# Altium PCB NB3000XN.PcbDoc (part 54 of 71)
Units mil, origin at the board's own origin, x right, y up, seen from the top; angles counter-clockwise.
Board outline 9527.56 x 6929.77 mil, 6 copper layers (Top Layer, GND+SHIELD, MidLayer1, MidLayer2, P2 - 3V3+5V0, Bottom Layer), stack 62.375 mil thick; 832 components, 1027 nets, 4655 pads, 4981 vias.
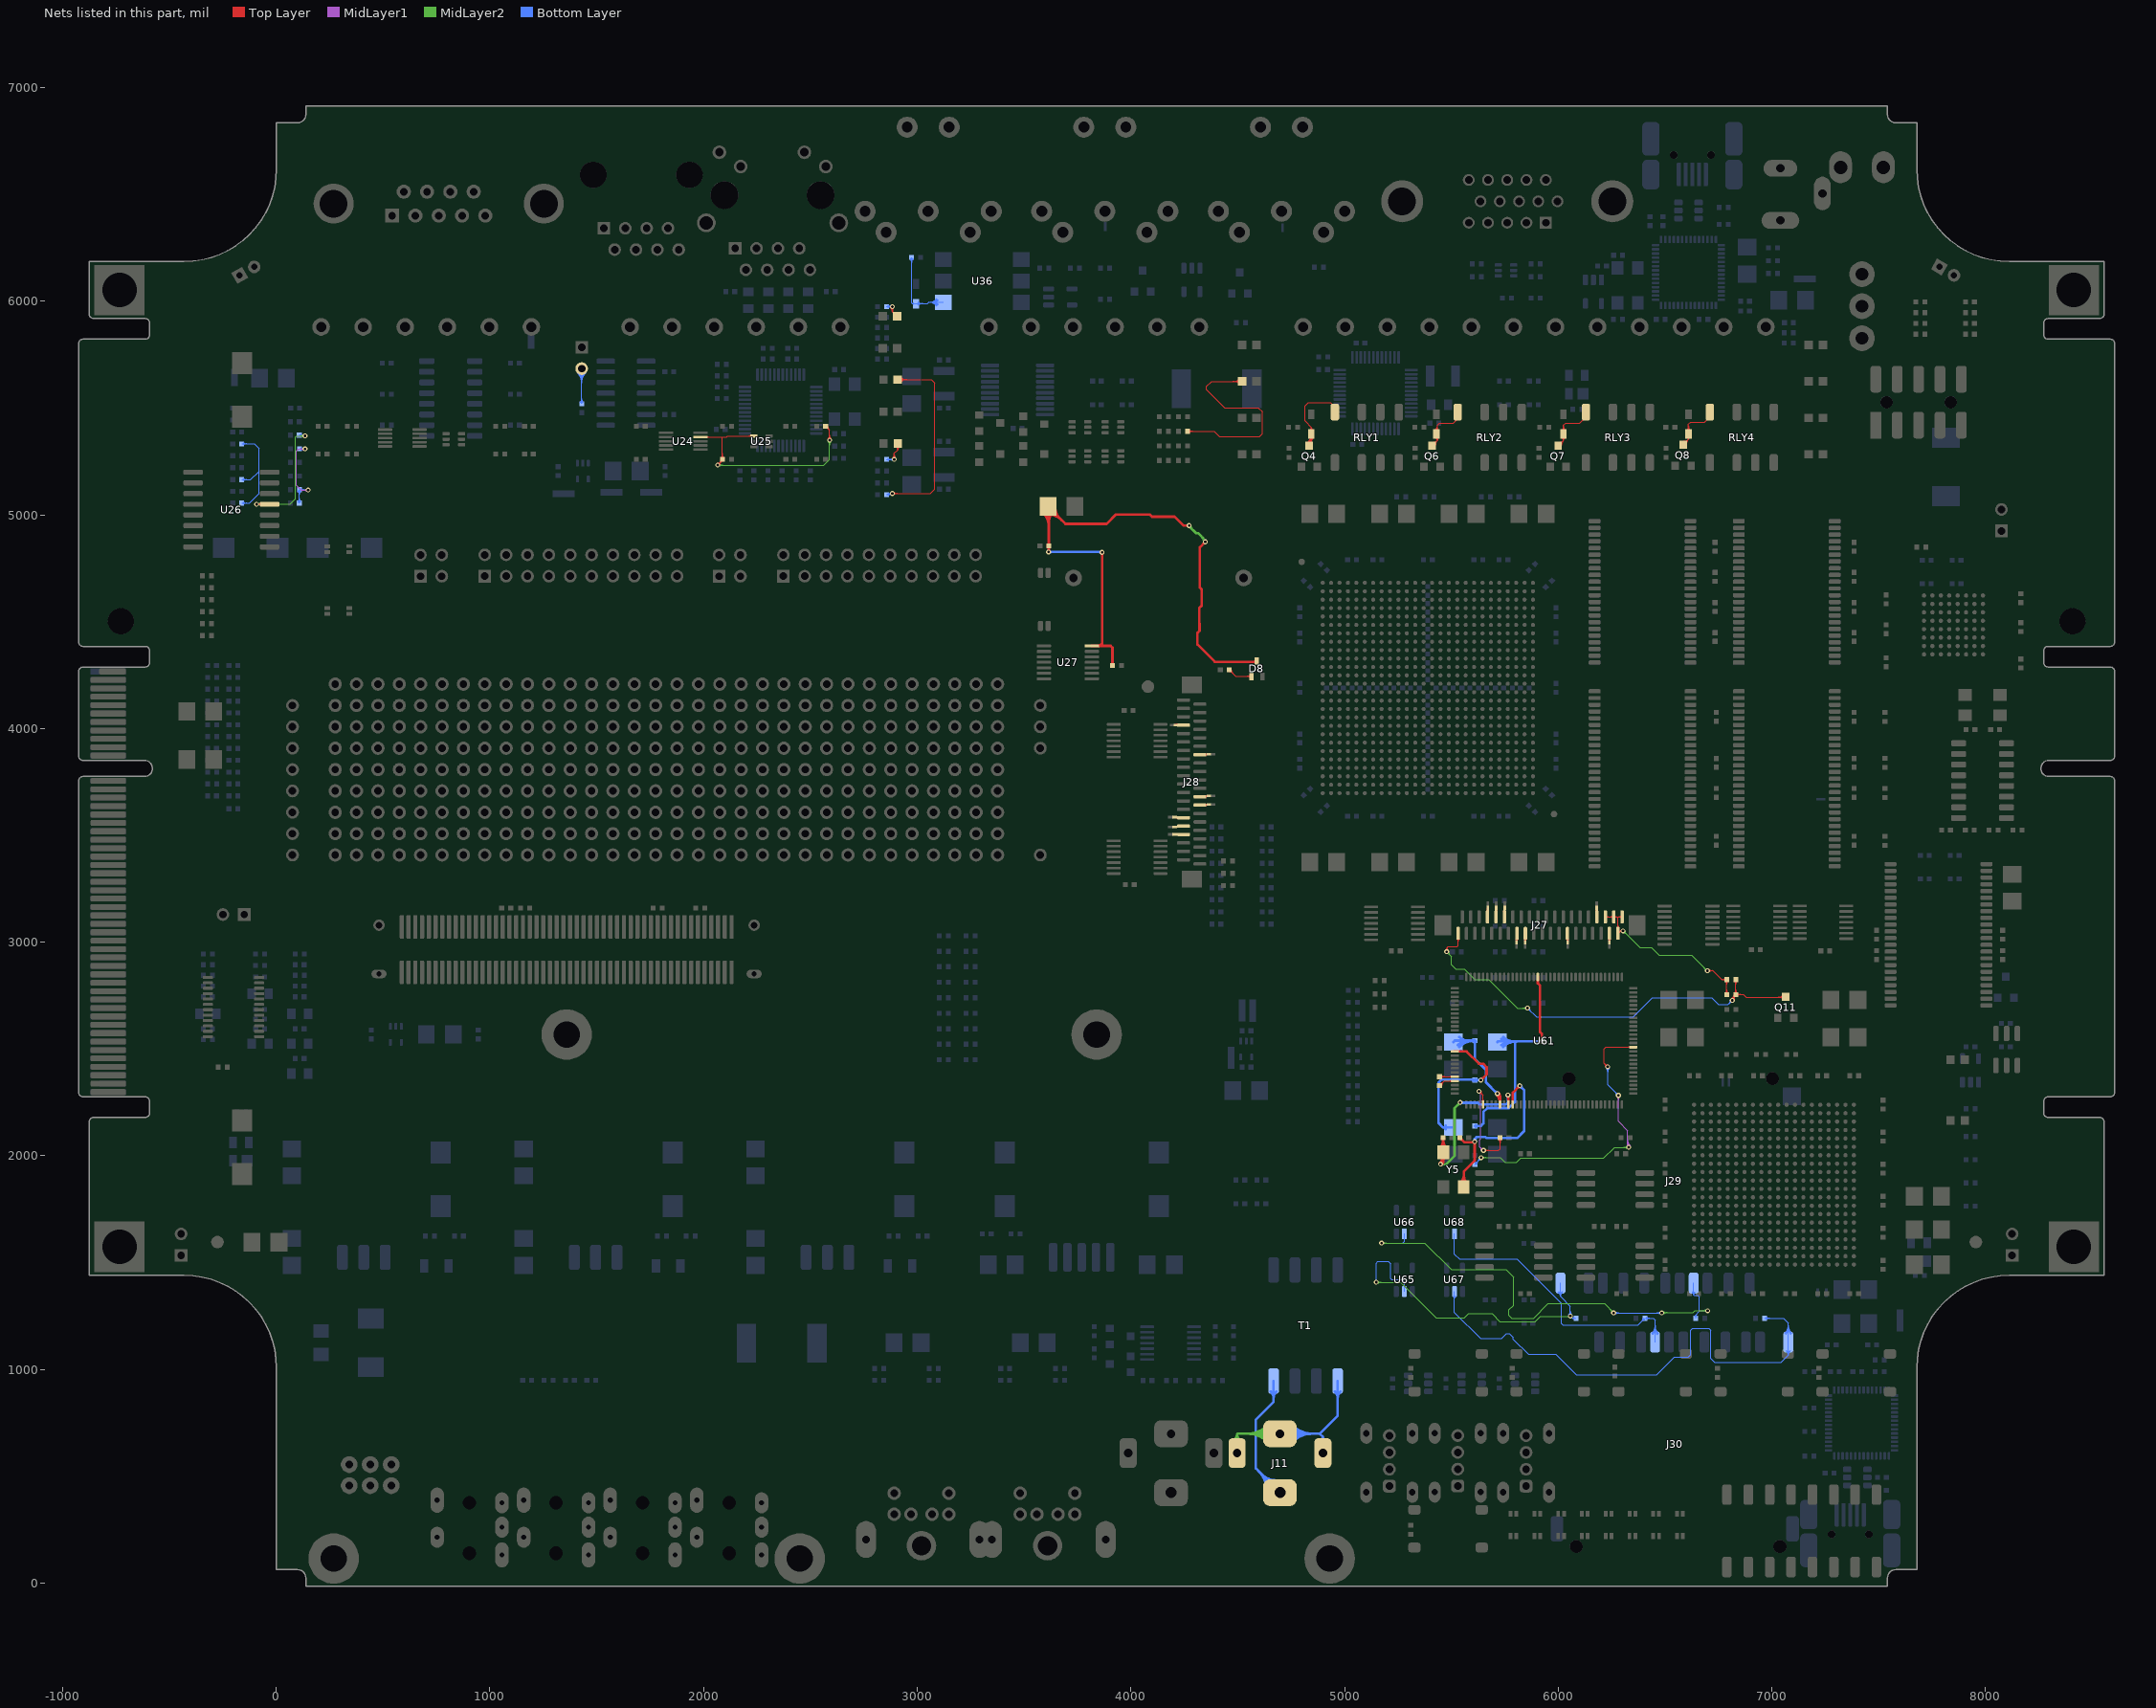
[diagram p58: the nets of this part, all layers, seen from the top]

## Via types
v1: diameter 23, hole 11.81, Top Layer to Bottom Layer, 3672 vias
v2: diameter 26, hole 11.81, Top Layer to Bottom Layer, 461 vias
v3: diameter 19, hole 11.81, Top Layer to Bottom Layer, tented both sides, 396 vias
v4: diameter 23.62, hole 11.81, Top Layer to Bottom Layer, 288 vias
v5: diameter 20, hole 11.81, Top Layer to Bottom Layer, 91 vias
v6: diameter 23, hole 11.81, Top Layer to Bottom Layer, tented both sides, 50 vias
v7: diameter 31, hole 11.81, Top Layer to Bottom Layer, 15 vias
v8: diameter 27.56, hole 11.81, Top Layer to Bottom Layer, tented both sides, 4 vias
v9: diameter 29, hole 11.81, Top Layer to Bottom Layer, 3 vias
v10: diameter 21, hole 11.81, Top Layer to Bottom Layer, 1 vias

## Nets (pads, with @x,y where several pads share a name; then routed paths per layer and width w, separated by ;. In a path a pad name is that pad's centre, name@x,y a point inside that pad or via, vN(x,y) a via of type N, cw(c..) or ccw(c..) an arc to the next point about the centre after c; other vN are vias at no path point) (continued)
NetC104_1: C104.1 R136.2 U24.4 U25.1 | length 1519
  Top Layer w4: U24.4@1985.71,5364.68 2089.69,5364.68 ; U24.4@2016,5361.86 cw(c2022.83,5355.03) 2022.83,5364.68 cw(c2022.83,5374.34) U24.4@2016,5367.51 ; v1(2066.19,5233.37) 2089.68,5256.87 R136.2@2089.68,5260 2087.19,5262.5 2087.19,5362.19 2089.69,5364.68 ; v1@2066.19,5238.87 ccw(c2066.19,5252.15) 2075.58,5242.76 ccw(c2084.97,5233.37) v1@2071.69,5233.37 ; v1@2066.19,5242.87 ccw(c2066.19,5265.81) 2082.41,5249.59 ccw(c2098.63,5233.37) v1@2075.69,5233.37 ; v1@2071.91,5239.1 ccw(c2051.5,5259.51) R136.2@2080.37,5259.51 ; 2078.28,5245.47 cw(c2089.68,5234.06) R136.2@2089.68,5250.19 ; 2078.74,5245.92 ccw(c2065.16,5259.51) R136.2@2084.37,5259.51 ; R136.2@2083.1,5267.08 ccw(c2073.21,5276.96) 2087.19,5276.96 ; 2087.19,5279.36 ccw(c2108.55,5279.36) R136.2@2093.45,5264.25 ; 2087.19,5289.02 ccw(c2118.21,5289.02) R136.2@2096.27,5267.08 ; U25.1@2221.99,5365.85 ccw(c2211.96,5355.82) 2211.96,5370 ccw(c2211.96,5384.18) U25.1@2221.99,5374.15 ; U25.1@2235,5370 2112.17,5370 2106.86,5364.68 2089.69,5364.68 ; C104.1@2571.54,5405.19 cw(c2571.53,5381.5) 2588.28,5398.25 cw(c2605.03,5415) C104.1@2581.35,5415 ; C104.1@2571.54,5409.19 cw(c2571.53,5395.16) 2581.45,5405.08 cw(c2591.38,5415) C104.1@2577.35,5415 ; C104.1@2571.54,5415 2590.19,5396.34 v1(2590.19,5350.04) ; v1@2583.47,5356.76 ccw(c2567.26,5372.98) 2590.19,5372.98 ccw(c2613.13,5372.98) v1@2596.91,5356.76 ; v1@2586.3,5353.93 ccw(c2576.91,5363.32) 2590.19,5363.32 ccw(c2603.47,5363.32) v1@2594.08,5353.93
  MidLayer2 w4: v1(2066.19,5233.37) 2535,5233.37 2563.37,5233.37 2590.19,5260.19 v1(2590.19,5350.04) ; v1@2070.08,5229.49 cw(c2079.47,5220.1) 2079.47,5233.37 cw(c2079.47,5246.65) v1@2070.08,5237.26 ; v1@2072.91,5226.66 cw(c2089.13,5210.44) 2089.13,5233.37 cw(c2089.13,5256.31) v1@2072.91,5240.09 ; v1@2583.47,5343.32 cw(c2567.26,5327.11) 2590.19,5327.11 cw(c2613.13,5327.11) v1@2596.91,5343.32 ; v1@2586.3,5346.15 cw(c2576.91,5336.76) 2590.19,5336.76 cw(c2603.47,5336.76) v1@2594.08,5346.15
NetC108_1: C108.1 U26.13 | length 913.3
  Top Layer w4: v1(-91.81,5050.04) -76.48,5050.04 ; v1@-88.12,5050.04 cw(c-88.12,5026.22) U26.13@-71.27,5043.06 ; v1@-87.92,5050.04 ccw(c-87.92,5073.59) U26.13@-71.27,5056.94 ; -78.46,5050.04 cw(c-78.46,5035.87) U26.13@-68.44,5045.89 ; -78.26,5050.04 ccw(c-78.26,5063.93) U26.13@-68.44,5054.11 ; U26.13@-73.93,5052.03 cw(c-76.43,5052.56) -76.43,5050 ; U26.13@-73.91,5052.1 cw(c-76.48,5052.66) -76.48,5050.04 ; U26.13@-30.87,5050 -76.43,5050 ; -76.48,5050.04 cw(c-76.48,5047.44) -73.93,5047.98 ccw(c-76.43,5047.44) -76.43,5050 ; -76.48,5050.04 -76.43,5050
  MidLayer2 w4: v1(-91.81,5050.04) 65.19,5050.04 90.19,5075.04 90.19,5365 95.19,5370 v1(135,5370) v1@135,5370.15 ; v1@-87.92,5046.15 cw(c-78.53,5036.76) -78.53,5050.04 cw(c-78.53,5063.32) v1@-87.92,5053.93 ; v1@-85.09,5043.32 cw(c-68.87,5027.11) -68.87,5050.04 cw(c-68.87,5072.98) v1@-85.09,5056.76 ; v1@128.28,5363.28 ccw(c112.06,5347.06) 112.06,5370 ccw(c112.06,5392.93) v1@128.28,5376.72 ; v1@131.11,5366.11 ccw(c121.72,5356.72) 121.72,5370 ccw(c121.72,5383.28) v1@131.11,5373.89
  Bottom Layer w4: C108.1@112.24,5368.83 cw(c122.16,5358.91) 122.16,5372.94 cw(c122.16,5386.97) C108.1@112.24,5377.05 ; C108.1@115.07,5366 cw(c131.81,5349.25) 131.81,5372.94 cw(c131.81,5396.62) C108.1@115.07,5379.88 ; C108.1@116.77,5372.94 cw(c116.77,5354.53) v1@130.81,5366.44 ; C108.1@119.16,5372.94 ccw(c119.16,5385.84) v1@128.28,5376.72 ; v1@127.76,5363.85 ccw(c108.13,5347.2) C108.1@108.13,5372.94 132.06,5372.94 v1(135,5370) v1@135,5370.15
NetC109_2: C109.2 R143.2 R146.1 | length 799.1
  MidLayer1 w4: v1@128.28,5302.65 ccw(c112.06,5286.43) 112.06,5309.37 ccw(c112.06,5332.3) v1@128.28,5316.09 ; v1@131.11,5305.48 ccw(c121.72,5296.09) 121.72,5309.37 ccw(c121.72,5322.65) v1@131.11,5313.26 ; v1(135,5309.37) 104.37,5309.37 95,5300 95,5138.65 116.94,5116.71 v1(149.52,5116.71) v1@151.52,5116.71 ; v1@142.81,5109.99 ccw(c126.59,5093.77) 126.59,5116.71 ccw(c126.59,5139.64) v1@142.81,5123.43 ; v1@145.64,5112.82 ccw(c136.25,5103.43) 136.25,5116.71 ccw(c136.25,5129.99) v1@145.64,5120.6
  Bottom Layer w4: C109.2@101.19,5062.02 ccw(c84.44,5078.77) 108.13,5078.77 ccw(c131.81,5078.77) C109.2@115.07,5062.02 ; R143.2@102.05,5111.57 cw(c86.14,5095.66) 108.64,5095.66 cw(c131.14,5095.66) R143.2@115.23,5111.57 ; C109.2@104.02,5059.19 ccw(c94.1,5069.11) 108.13,5069.11 ccw(c122.16,5069.11) C109.2@112.24,5059.19 ; R143.2@104.88,5114.4 cw(c95.8,5105.32) 108.64,5105.32 cw(c121.48,5105.32) R143.2@112.4,5114.4 ; C109.2@108.13,5055.08 108.13,5083.37 108.64,5083.89 R143.2@108.64,5118.65 135.52,5118.65 137.47,5116.71 v1(149.52,5116.71) ; R146.1@108.64,5309.37 v1(135,5309.37) ; R143.2@112.4,5114.89 cw(c121.48,5105.81) 121.48,5118.65 cw(c121.48,5131.5) R143.2@112.4,5122.41 ; R146.1@112.4,5305.61 cw(c121.48,5296.53) 121.48,5309.37 cw(c121.48,5322.21) R146.1@112.4,5313.13 ; R143.2@115.23,5112.06 cw(c131.14,5096.16) 131.14,5118.65 cw(c131.14,5141.15) R143.2@115.23,5125.24 ; R146.1@115.23,5302.78 cw(c131.14,5286.87) 131.14,5309.37 cw(c131.14,5331.86) R146.1@115.23,5315.96 ; v1@128.28,5302.65 ccw(c112.06,5286.43) 112.06,5309.37 ccw(c112.06,5332.3) v1@128.28,5316.09 ; v1@131.11,5305.48 ccw(c121.72,5296.09) 121.72,5309.37 ccw(c121.72,5322.65) v1@131.11,5313.26
NetC110_1: C110.1 R144.2 R145.2 | length 666
  Bottom Layer w4: C110.1@-161.36,5055.08 -124.92,5055.08 -80.81,5099.19 -80.81,5204.19 ; R145.2@-160.85,5165.08 -119.92,5165.08 -80.81,5204.19 ; R144.2@-160.85,5332.58 -102.58,5332.58 -80.81,5310.81 -80.81,5204.19 ; C110.1@-157.25,5050.97 cw(c-147.33,5041.05) -147.33,5055.08 cw(c-147.33,5069.11) C110.1@-157.25,5059.19 ; R145.2@-157.09,5161.32 cw(c-148.01,5152.24) -148.01,5165.08 cw(c-148.01,5177.92) R145.2@-157.09,5168.84 ; R144.2@-157.09,5328.82 cw(c-148.01,5319.74) -148.01,5332.58 cw(c-148.01,5345.42) R144.2@-157.09,5336.34 ; C110.1@-154.42,5048.14 cw(c-137.67,5031.4) -137.67,5055.08 cw(c-137.67,5078.77) C110.1@-154.42,5062.02 ; R145.2@-154.26,5158.49 cw(c-138.35,5142.58) -138.35,5165.08 cw(c-138.35,5187.58) R145.2@-154.26,5171.67 ; R144.2@-154.26,5325.99 cw(c-138.35,5310.08) -138.35,5332.58 cw(c-138.35,5355.08) R144.2@-154.26,5339.17
NetC115_1: C115.1 C116.1 D8.3 R148.1 U27.14 | length 3427.9
  Top Layer w4: C116.1@3615.19,4854.52 C116.1@3615.67,4855
  Top Layer w12: C115.1@3588.41,5012.47 cw(c3522.61,4946.66) 3615.67,4946.66 ; C115.1@3596.9,5020.95 cw(c3551.58,4975.63) 3615.67,4975.63 ; v1@3611.3,4830.6 ccw(c3600.76,4841.14) 3615.67,4841.14 ; C116.1@3611.56,4850.89 cw(c3601.64,4840.97) 3615.67,4840.97 cw(c3629.7,4840.97) C116.1@3619.78,4850.89 ; C116.1@3611.56,4859.11 ccw(c3601.64,4869.03) 3615.67,4869.03 ccw(c3629.7,4869.03) C116.1@3619.78,4859.11 ; C116.1@3612.01,4858.66 C116.1@3615.67,4855 ; C115.1@3612.01,5002.69 cw(c3612.01,4912.63) 3675.7,4976.31 ; C115.1@3612.01,5014.69 cw(c3612.01,4953.6) 3655.21,4996.8 ; C115.1@3612.01,5040 C115.1@3615.67,5036.34 ; v1@3615.67,4827.19 C116.1@3615.67,4855 ; 3615.67,4838.83 ccw(c3627.31,4838.83) v1@3619.08,4830.6 ; 3615.67,4964.34 cw(c3683.73,4964.34) C115.1@3635.6,5012.47 ; 3615.67,4993.31 cw(c3654.76,4993.31) C115.1@3627.12,5020.95 ; C115.1@3633.38,5036.06 ccw(c3675.47,5036.06) C115.1@3645.71,5006.3 ; C115.1@3645.38,5036.06 ccw(c3716.44,5036.06) 3666.19,4985.82 ; U27.14@3817.2,4386.77 3853.63,4386.77 ; U27.14@3843.78,4387.66 ccw(c3843.78,4413.59) 3862.11,4395.26 ; v1@3861.3,4821.15 cw(c3851.91,4811.76) 3865.19,4811.76 cw(c3878.47,4811.76) v1@3869.08,4821.15 ; v1(3865.19,4825.04) 3865.19,4398.33 3853.63,4386.77 ; R148.1@3910.06,4299.25 ccw(c3900.98,4308.33) 3913.82,4308.33 ccw(c3926.66,4308.33) R148.1@3917.58,4299.25 ; R148.1@3913.82,4295 3913.82,4378.77 3905.82,4386.77 3853.63,4386.77 ; v1@4268.97,4946.15 ccw(c4259.58,4936.76) 4259.58,4950.04 ccw(c4259.58,4963.32) v1@4268.97,4953.93 ; v1(4272.86,4950.04) 4246.67,4950.04 4205,4991.71 4099.14,4991.71 4089.03,5001.81 3930.28,5001.81 3886.96,4958.5 3693.51,4958.5 C115.1@3615.67,5036.34 ; v1@4343.02,4874.37 cw(c4329.75,4874.37) 4339.14,4864.99 cw(c4348.52,4855.6) v1@4348.52,4868.87 ; v1(4348.52,4874.37) 4323.02,4848.87 4323.02,4660.47 4331.5,4651.99 4331.5,4574.78 4320,4563.28 4320,4492.3 4321.5,4490.8 4321.5,4457.99 4312.02,4448.51 4312.02,4392.84 4392.65,4312.21 4586.78,4312.21 D8.3@4590,4315.43 ; 4572.57,4312.21 ccw(c4572.57,4332.87) D8.3@4587.17,4318.26 ; C116.1@3615.67,4855 C115.1@3615.67,5036.34
  MidLayer2 w12: v1(4272.86,4950.04) 4272.86,4946.8 4304.63,4915.02 4313.95,4915.02 4348.52,4880.45 v1(4348.52,4874.37) ; v1@4278.36,4950.04 ccw(c4299.46,4950.04) 4284.54,4935.12 ; 4334.84,4894.13 cw(c4315.09,4874.37) v1@4343.02,4874.37
  Bottom Layer w12: v1(3615.19,4826.71) v1@3863.52,4826.71 ; v1@3619.08,4822.82 cw(c3628.47,4813.43) 3628.47,4826.71 cw(c3628.47,4839.99) v1@3619.08,4830.6 ; 3847.89,4826.71 cw(c3847.89,4807.74) v1@3861.3,4821.15
NetC157_2: C157.2 U61.11 Y5.1 | length 1098.4
  Top Layer w12: v1@5445.64,1965.26 ccw(c5407.74,2003.16) Y5.1@5461.33,2003.16 ; Y5.1@5447.3,2035.7 ccw(c5413.42,2069.58) 5461.33,2069.58 ; v1(5449.52,1961.37) 5461.33,1973.18 ; Y5.1@5450.07,1994.96 cw(c5434.61,1973.17) 5461.33,1973.17 ; v1@5454.12,1956.78 ccw(c5436.71,1974.19) 5461.33,1974.19 ; C157.2@5457.22,2080.89 cw(c5447.3,2070.97) 5461.33,2070.97 cw(c5475.36,2070.97) C157.2@5465.44,2080.89 ; C157.2@5461.33,2075.23 ccw(c5517.23,2075.23) Y5.1@5477.7,2035.7 ; C157.2@5461.33,2085 5461.33,1973.18 ; Y5.1@5473.28,1993.9 ccw(c5485.29,1973.17) 5461.33,1973.17 ; v1@5761.11,2281.11 cw(c5747.26,2267.26) 5766.85,2267.26 ; v1(5765,2285) 5766.85,2283.15 U61.11@5766.85,2240
  MidLayer2 w12: v1(5449.52,1961.37) 5476.37,1961.37 5515.19,2000.19 5515.19,2223.71 v1(5541.52,2250.04) ; v1@5453.41,1957.49 cw(c5462.8,1948.1) 5462.8,1961.37 cw(c5462.8,1974.65) v1@5453.41,1965.26 ; v1@5536.02,2250.04 cw(c5522.75,2250.04) 5532.14,2240.65 cw(c5541.52,2231.26) v1@5541.52,2244.54
  Bottom Layer w12: v1(5541.52,2250.04) 5543.38,2248.19 5625,2248.19 5633.3,2239.89 5729.04,2239.89 5754.89,2239.89 5765,2250 v1(5765,2285) v1@5770.9,2285 ; v1@5545.41,2253.93 ccw(c5559.27,2267.79) 5559.27,2248.19 ; v1@5761.11,2281.11 cw(c5751.72,2271.72) 5765,2271.72 cw(c5778.28,2271.72) v1@5768.89,2281.11
NetC169_2: C169.2 U61.12 Y5.3 | length 1095.6
  Top Layer w12: C169.2@5539.33,2079.19 cw(c5539.33,2065.16) 5549.25,2075.08 cw(c5559.17,2085) C169.2@5545.14,2085 ; C169.2@5539.33,2085 5561.14,2063.19 5606,2063.19 v1(5609.19,2066.37) 5609.19,1977.37 5559.1,1927.29 5559.1,1855.1 Y5.3@5557.5,1853.5 ; Y5.3@5542.3,1872.7 ccw(c5501.73,1913.27) 5559.1,1913.27 ; 5559.1,1905.54 ccw(c5605.54,1905.54) Y5.3@5572.7,1872.7 ; v1@5605.3,2062.49 cw(c5595.91,2053.1) 5609.19,2053.1 cw(c5622.47,2053.1) v1@5613.08,2062.49 ; U61.12@5786.53,2240 5786.53,2273.8 5787.73,2275 5787.73,2295.92 v1(5820.19,2328.37) ; v1@5814.69,2328.37 cw(c5801.41,2328.37) 5810.8,2318.99 cw(c5820.19,2309.6) v1@5820.19,2322.87
  Bottom Layer w12: v1(5609.19,2066.37) 5609.19,2079.19 5618.21,2088.21 ; v1@5614.27,2068.48 cw(c5631.02,2075.39) 5618.21,2088.21 ; v1@5820.19,2322.87 cw(c5820.19,2309.6) 5829.58,2318.99 cw(c5838.97,2328.37) v1@5825.69,2328.37 ; v1@5826.63,2328.37 v1(5820.19,2328.37) 5840.69,2307.87 5840.69,2115.19 5808.87,2083.37 5664.26,2083.37 5659.43,2088.21 5618.21,2088.21
NetC186_1: C186.1 U61.124 | length 146.3
  Top Layer w4: C186.1@5445,2370.67 5473.52,2370.67 5473.57,2370.72 U61.124@5516.83,2370.72 ; C186.1@5449.11,2366.56 cw(c5459.03,2356.64) 5459.03,2370.67 cw(c5459.03,2384.7) C186.1@5449.11,2374.78 ; C186.1@5451.94,2363.73 cw(c5468.68,2346.98) 5468.68,2370.67 cw(c5468.69,2394.36) C186.1@5451.94,2377.61 ; U61.124@5500.81,2367.89 ccw(c5493.98,2361.06) 5493.98,2370.72 ccw(c5493.98,2380.37) U61.124@5500.81,2373.54
NetC186_2: C186.2 U61.125 | length 155.2
  Top Layer w4: C186.2@5445,2329.33 5466.7,2351.03 U61.125@5516.83,2351.03 ; C186.2@5445,2335.14 ccw(c5445,2349.17) 5454.92,2339.25 ccw(c5464.84,2329.33) C186.2@5450.81,2329.33 ; C186.2@5445,2339.14 ccw(c5445,2362.83) 5461.75,2346.08 ; C186.2@5454.81,2329.33 cw(c5478.5,2329.33) 5461.75,2346.08 ; U61.125@5500.81,2348.2 ccw(c5493.98,2341.37) 5493.98,2351.03 ccw(c5493.98,2360.69) U61.125@5500.81,2353.86
NetC187_1: C187.1 U61.5 | length 743.4
  Top Layer w4: v1@5629.18,2292.81 cw(c5629.18,2269.88) 5645.4,2286.09 cw(c5661.62,2302.31) v1@5638.68,2302.31 ; v1@5629.18,2296.81 cw(c5629.18,2283.53) 5638.57,2292.92 cw(c5647.96,2302.31) v1@5634.68,2302.31 ; v1(5629.18,2302.31) 5648.74,2282.75 U61.5@5648.74,2240 ; U61.5@5645.91,2256.02 ccw(c5639.08,2262.85) 5648.74,2262.85 ccw(c5658.4,2262.85) U61.5@5651.57,2256.02 ; v4(5650,2025) 5720,2025 5728.08,2033.08 C187.1@5728.08,2085 ; v4@5654.11,2020.89 cw(c5664.03,2010.97) 5664.03,2025 cw(c5664.03,2039.03) v4@5654.11,2029.11 ; v4@5656.94,2018.06 cw(c5673.69,2001.31) 5673.69,2025 cw(c5673.69,2048.69) v4@5656.94,2031.94 ; C187.1@5721.14,2078.06 cw(c5704.39,2061.31) 5728.08,2061.31 cw(c5751.76,2061.31) C187.1@5735.01,2078.06 ; C187.1@5723.97,2080.89 cw(c5714.05,2070.97) 5728.08,2070.97 cw(c5742.1,2070.97) C187.1@5732.18,2080.89
  MidLayer1 w4: v1(5629.18,2302.31) 5637.81,2293.68 5637.81,2078.74 5633.02,2073.96 5633.02,2041.98 v4(5650,2025) ; v4@5640.19,2025 ccw(c5616.5,2025) 5633.25,2041.75 ccw(c5650,2058.5) v4@5650,2034.81 ; v4@5644.19,2025 ccw(c5630.16,2025) 5640.08,2034.92 ccw(c5650,2044.84) v4@5650,2030.81
NetC336_1: C336.1 C340.1 U61.9 | length 763.6
  Top Layer w12: v1@5711.3,2287.82 cw(c5672.24,2248.76) U61.9@5727.48,2248.76 ; v1(5715.19,2291.71) 5727.48,2279.42 U61.9@5727.48,2240 ; v1@5719.79,2296.3 cw(c5701.21,2277.73) 5727.48,2277.73
  Bottom Layer w12: C340.1@5510,2532.99 5516.34,2539.33 C336.1@5610,2539.33 5610,2455.3 5661.69,2403.61 5661.69,2345.21 v1(5715.19,2291.71) ; C340.1@5529.05,2517.88 cw(c5580.83,2466.1) 5580.83,2539.33 ; C340.1@5537.53,2509.4 cw(c5609.8,2437.13) C336.1@5609.8,2539.33 ; C340.1@5537.53,2556.59 ccw(c5579.2,2598.25) 5579.2,2539.33 ; C336.1@5605.89,2543.44 cw(c5595.97,2553.36) 5595.97,2539.33 cw(c5595.97,2525.3) 5605.89,2535.22 cw(c5595.97,2525.3) 5610,2525.3 cw(c5624.03,2525.3) C336.1@5614.11,2535.22 ; v1@5709.69,2291.71 ccw(c5696.41,2291.71) 5705.8,2301.1 ccw(c5715.19,2310.49) v1@5715.19,2297.21
NetC337_1: C337.1 C341.1 U61.118 | length 839.3
  Top Layer w12: U61.118@5516.83,2488.83 5571.17,2488.83 5628.63,2431.37 5648.63,2431.37 5665.19,2414.81 5665.19,2381.37 v1(5638.19,2354.37) ; v1@5638.19,2359.87 ccw(c5638.19,2373.15) 5647.58,2363.76 ccw(c5656.97,2354.37) v1@5643.69,2354.37
  Bottom Layer w4: v1@5638.15,2354.33 v1(5638.19,2354.37)
  Bottom Layer w12: C341.1@5473.94,2123.95 ccw(c5462.01,2120.6) 5462.01,2132.99 ; C341.1@5473.94,2142.03 cw(c5462.01,2145.39) 5462.01,2132.99 ; C341.1@5510,2132.99 5462.01,2132.99 ; 5587.99,2357.64 cw(c5587.99,2332.32) C337.1@5605.89,2350.22 ; C337.1@5614.11,2350.22 cw(c5624.03,2340.3) 5624.03,2354.33 cw(c5624.03,2368.36) C337.1@5614.11,2358.44 ; 5624.81,2354.33 ccw(c5624.81,2367.76) v1@5634.3,2358.26 ; 5625.02,2354.33 cw(c5625.02,2341.2) v1@5634.3,2350.49 ; v1@5638.15,2354.33 C337.1@5610,2354.33 5606.69,2357.64 5454.49,2357.64 5440,2343.14 5440,2155 5462.01,2132.99
NetC338_1: C338.1 C342.1 U61.85 | length 1340
  Top Layer w12: U61.85@5904.65,2837.34 5904.65,2807.4 5915.19,2796.85 5915.19,2580 5923.52,2571.67 v1(5923.52,2535.71) ; v1@5919.64,2539.6 ccw(c5910.25,2548.99) 5923.52,2548.99 ccw(c5936.8,2548.99) v1@5927.41,2539.6
  Bottom Layer w12: C338.1@5610,2139.33 5637.14,2139.33 5650,2152.19 5650,2205 5668.89,2223.89 5768.89,2223.89 5797.69,2252.69 5797.69,2528.4 5805,2535.71 ; C338.1@5614.11,2135.22 cw(c5624.03,2125.3) 5624.03,2139.33 cw(c5624.03,2153.36) C338.1@5614.11,2143.44 ; C342.1@5715,2532.99 5717.72,2535.71 5805,2535.71 ; C342.1@5734.05,2548.1 ccw(c5763.97,2578.03) 5763.97,2535.71 ; C342.1@5734.18,2518.01 cw(c5776.38,2476.54) 5776.38,2535.71 ; C342.1@5742.53,2556.59 ccw(c5792.94,2607) 5792.94,2535.71 ; C342.1@5742.74,2509.6 cw(c5805,2448.42) 5805,2535.71 ; v1@5919.64,2531.82 ccw(c5910.25,2522.43) 5910.25,2535.71 ccw(c5910.25,2548.99) v1@5919.64,2539.6 ; v1(5923.52,2535.71) 5805,2535.71
NetC339_1: C339.1 U61.50 | length 1969
  Top Layer w4: v1@6222.36,2416.71 ccw(c6199.42,2416.71) 6215.64,2432.93 ccw(c6231.86,2449.14) v1@6231.86,2426.21 ; v1@6226.36,2416.71 ccw(c6213.08,2416.71) 6222.47,2426.1 ccw(c6231.86,2435.49) v1@6231.86,2422.21 ; v1(6231.86,2416.71) 6215.19,2433.37 6215.19,2500.04 6223.66,2508.51 U61.50@6351.93,2508.51 ; U61.50@6335.91,2505.68 ccw(c6329.08,2498.85) 6329.08,2508.51 ccw(c6329.08,2518.17) U61.50@6335.91,2511.34
  MidLayer1 w4: v1@6275.14,2276.66 cw(c6258.92,2260.44) 6281.86,2260.44 cw(c6304.79,2260.44) v1@6288.57,2276.66 ; v1@6277.97,2279.49 cw(c6268.58,2270.1) 6281.86,2270.1 cw(c6295.14,2270.1) v1@6285.75,2279.49 ; v1(6281.86,2283.37) 6281.86,2161.63 6325,2118.48 6325,2040 v4(6330,2040) ; v4@6323.06,2046.94 ccw(c6318.39,2051.61) 6325,2051.61 ; 6325,2056.44 ccw(c6346.44,2056.44) v4@6331.28,2041.28 ; 6325,2066.1 ccw(c6356.1,2066.1) v4@6334.11,2044.11 ; 6325,2075.76 ccw(c6365.76,2075.76) v4@6336.94,2046.94
  MidLayer2 w4: v1(5639.52,1991.71) 5729.23,1991.71 5750.4,1970.54 5805.77,1970.54 5825.23,1990 6213.23,1990 6263.23,2040 v4(6330,2040) ; v1@5643.41,1987.82 cw(c5652.8,1978.43) 5652.8,1991.71 cw(c5652.8,2004.99) v1@5643.41,1995.6 ; v1@5646.24,1984.99 cw(c5662.46,1968.77) 5662.46,1991.71 cw(c5662.46,2014.64) v1@5646.24,1998.43 ; v4@6323.06,2033.06 ccw(c6306.31,2016.31) 6306.31,2040 ccw(c6306.31,2063.69) v4@6323.06,2046.94 ; v4@6325.89,2035.89 ccw(c6315.97,2025.97) 6315.97,2040 ccw(c6315.97,2054.03) v4@6325.89,2044.11
  Bottom Layer w4: C339.1@5610,1959.33 v1@5639.52,1988.85 ; C339.1@5610,1965.14 ccw(c5610,1979.17) 5619.92,1969.25 ccw(c5629.84,1959.33) C339.1@5615.81,1959.33 ; C339.1@5610,1969.14 ccw(c5610,1992.83) 5626.75,1976.08 ; C339.1@5619.81,1959.33 cw(c5643.5,1959.33) 5626.75,1976.08 ; C339.1@5621.29,1970.62 ccw(c5600.2,1991.71) v1@5630.02,1991.71 ; 5628.12,1977.45 ccw(c5613.86,1991.71) v1@5634.02,1991.71 ; 5628.18,1977.51 cw(c5639.52,1966.16) v1@5639.52,1982.21 ; v1@6225.14,2409.99 cw(c6208.92,2393.77) 6231.86,2393.77 cw(c6254.79,2393.77) v1@6238.57,2409.99 ; v1@6227.97,2412.82 cw(c6218.58,2403.43) 6231.86,2403.43 cw(c6245.14,2403.43) v1@6235.75,2412.82 ; v1(6231.86,2416.71) 6231.86,2333.37 v1(6281.86,2283.37) ; v1@6272.36,2283.37 ccw(c6249.42,2283.37) 6265.64,2299.59 ccw(c6281.86,2315.81) v1@6281.86,2292.87 ; v1@6276.36,2283.37 ccw(c6263.08,2283.37) 6272.47,2292.76 ccw(c6281.86,2302.15) v1@6281.86,2288.87
NetD3_1: D3.1 Q4.2 RLY1.8 | length 744
  Top Layer w4: Q4.2@4825.18,5337.46 ccw(c4792.13,5378.74) D3.1@4845,5378.74 ; Q4.2@4827.68,5334.34 ccw(c4798.79,5370.41) D3.1@4845,5370.41 ; Q4.2@4830.18,5331.22 ccw(c4805.46,5362.08) D3.1@4845,5362.08 ; Q4.2@4832.68,5328.1 ccw(c4812.13,5353.75) 4845,5353.75 ; Q4.2@4835,5324.21 4845,5334.21 D3.1@4845,5378.74 ; Q4.2@4835.18,5324.98 ccw(c4818.8,5345.43) 4845,5345.43 ; D3.1@4835.81,5362.05 cw(c4813.62,5339.85) 4845,5339.85 cw(c4876.39,5339.85) D3.1@4854.19,5362.05 ; D3.1@4837.92,5397.14 ccw(c4829.44,5410.19) 4845,5410.19 ; D3.1@4838.64,5364.88 cw(c4823.27,5349.51) 4845,5349.51 cw(c4866.73,5349.51) D3.1@4851.36,5364.88 ; D3.1@4840.1,5393.79 ccw(c4834.23,5402.82) 4845,5402.82 ccw(c4855.77,5402.82) D3.1@4849.9,5393.79 ; D3.1@4852.08,5397.14 cw(c4860.56,5410.19) 4845,5410.19 ; 4937.64,5522.36 cw(c4925.38,5510.11) RLY1.8@4941.93,5504.97 ; 4939.47,5520.53 ccw(c4953.86,5534.91) RLY1.8@4954.54,5514.58 ; RLY1.8@4942.32,5517.68 cw(c4932.53,5507.89) RLY1.8@4945.75,5503.78 ; RLY1.8@4955,5481.22 4955,5505 4935,5525 4830,5525 4815,5510 4815,5440.19 4845,5410.19 ; D3.1@4845,5378.74 4845,5410.19
NetD4_1: D4.1 Q6.2 RLY2.8 | length 455.9
  Top Layer w4: Q6.2@5410.51,5324.72 5435,5349.21 ; Q6.2@5410.76,5332.88 ccw(c5412.27,5348.05) Q6.2@5423.05,5337.27 ; Q6.2@5411.16,5336.86 ccw(c5413.35,5358.91) 5429.03,5343.24 ; Q6.2@5411.56,5340.84 ccw(c5414.43,5369.78) 5435,5349.21 ; Q6.2@5421.71,5325.58 cw(c5444.83,5326.33) 5428.47,5342.69 ; D4.1@5422.76,5397.03 ccw(c5407.35,5420) 5435,5420 ; D4.1@5424.99,5393.71 ccw(c5412.38,5412.5) 5435,5412.5 ; Q6.2@5425.71,5325.71 cw(c5457.47,5326.74) 5435,5349.21 ; D4.1@5427.1,5358.57 cw(c5424.83,5348.65) 5435,5348.65 ; D4.1@5427.21,5390.39 ccw(c5417.41,5404.99) 5435,5404.99 ; D4.1@5427.99,5362.47 cw(c5425.98,5353.67) 5435,5353.67 ; 5435,5351.93 cw(c5449.31,5351.93) D4.1@5439.19,5362.05 ; D4.1@5435,5370 5435,5349.21 ; D4.1@5435,5373.74 5435,5420 ; 5435,5405.55 ccw(c5449.31,5405.55) D4.1@5439.19,5395.43 ; RLY2.8@5535,5476.22 5535,5455 5510,5430 5445,5430 5435,5420
NetD5_1: D5.1 Q7.2 RLY3.8 | length 477.2
  Top Layer w4: Q7.2@6000.51,5324.72 6025,5349.21 ; Q7.2@6000.76,5332.88 ccw(c6002.27,5348.05) Q7.2@6013.05,5337.27 ; Q7.2@6001.16,5336.86 ccw(c6003.35,5358.91) 6019.03,5343.24 ; Q7.2@6001.56,5340.84 ccw(c6004.43,5369.78) 6025,5349.21 ; Q7.2@6011.71,5325.58 cw(c6034.83,5326.33) 6018.47,5342.69 ; Q7.2@6015.71,5325.71 cw(c6047.47,5326.74) 6025,5349.21 ; D5.1@6015.81,5395.43 ccw(c5993.62,5417.62) 6025,5417.62 ccw(c6056.39,5417.62) D5.1@6034.19,5395.43 ; D5.1@6018.64,5392.6 ccw(c6003.27,5407.97) 6025,5407.97 ccw(c6046.73,5407.97) D5.1@6031.36,5392.6 ; D5.1@6018.72,5359.86 cw(c6012.84,5349.21) 6025,5349.21 ; D5.1@6020.65,5363.36 cw(c6016.58,5355.99) 6025,5355.99 cw(c6033.42,5355.99) D5.1@6029.35,5363.36 ; D5.1@6025,5370 6025,5349.21 ; D5.1@6025,5373.74 6025,5420 6035,5430 6100,5430 6125,5455 RLY3.8@6125,5476.22 ; D5.1@6031.28,5359.86 ccw(c6037.16,5349.21) 6025,5349.21
  Top Layer w12: RLY3.8@6123.82,5475.04 RLY3.8@6130,5481.22
NetD6_1: D6.1 Q8.2 RLY4.8 | length 440.8
  Top Layer w4: Q8.2@6585,5329.21 Q8.2@6586.02,5329.21 ; Q8.2@6585.51,5329.72 6610,5354.21 ; Q8.2@6585.76,5337.88 ccw(c6587.27,5353.05) Q8.2@6598.05,5342.27 ; Q8.2@6586.16,5341.86 ccw(c6588.35,5363.91) 6604.03,5348.24 ; Q8.2@6586.56,5345.84 ccw(c6589.43,5374.78) 6610,5354.21 ; Q8.2@6596.71,5330.58 cw(c6619.83,5331.33) 6603.47,5347.69 ; Q8.2@6600.71,5330.71 cw(c6632.47,5331.74) 6610,5354.21 ; D6.1@6600.81,5395.43 ccw(c6578.62,5417.62) 6610,5417.62 ccw(c6641.39,5417.62) D6.1@6619.19,5395.43 ; D6.1@6603.64,5392.6 ccw(c6588.27,5407.97) 6610,5407.97 ccw(c6631.73,5407.97) D6.1@6616.36,5392.6 ; D6.1@6606.58,5358.7 cw(c6605.35,5354.21) 6610,5354.21 ; D6.1@6610,5375 6610,5354.21 ; D6.1@6610,5378.74 6610,5425 6620,5435 6685,5435 6710,5460 RLY4.8@6710,5481.22 ; D6.1@6613.43,5358.7 ccw(c6614.65,5354.21) 6610,5354.21
  Top Layer w12: RLY4.8@6707.85,5483.37 RLY4.8@6710,5481.22
NetD8_1: D8.1 R147.2 | length 201.7
  Top Layer w4: R147.2@4461.18,4265.19 cw(c4461.18,4241.5) 4477.93,4258.25 ; R147.2@4461.18,4269.19 cw(c4461.18,4255.16) R147.2@4471.1,4265.08 ; R147.2@4461.18,4275 4491.61,4244.57 D8.1@4564.41,4244.57 ; R147.2@4466.5,4274.51 ccw(c4478.15,4274.51) R147.2@4469.91,4266.27 ; R147.2@4470.5,4274.51 ccw(c4491.81,4274.51) 4476.74,4259.44 ; D8.1@4558.75,4238.91 ccw(c4545.1,4225.25) 4545.1,4244.57 ccw(c4545.1,4263.88) D8.1@4558.75,4250.22
NetD9_2: D9.2 R194.1 U36.1 | length 794.7
  Bottom Layer w4: R194.1@2967.23,6197.92 cw(c2951.32,6182.01) 2973.82,6182.01 cw(c2996.32,6182.01) R194.1@2980.41,6197.92 ; R194.1@2970.06,6200.75 cw(c2960.98,6191.67) 2973.82,6191.67 cw(c2986.66,6191.67) R194.1@2977.58,6200.75 ; R194.1@2973.82,6205 2973.82,5991.41 2976.49,5988.74 ; D9.2@2982.77,5984.33 ccw(c2976.49,5982.05) 2976.49,5988.74 ; D9.2@2982.77,5993.15 cw(c2976.49,5995.42) 2976.49,5988.74 ; D9.2@3001.36,5982.38 cw(c3016.73,5967.01) 3016.73,5988.74 cw(c3016.73,6010.47) D9.2@3001.36,5995.1 ; D9.2@3004.19,5979.55 cw(c3026.38,5957.36) 3026.38,5988.74 cw(c3026.39,6020.13) D9.2@3004.19,5997.93 ; U36.1@3090.33,5976.3 ccw(c3054.79,5951.87) 3054.79,5995 ; U36.1@3090.33,6013.69 cw(c3054.79,6038.13) 3054.79,5995 ; U36.1@3093.62,5978.57 ccw(c3062.39,5957.1) 3062.39,5995 ccw(c3062.39,6032.9) U36.1@3093.62,6011.43 ; U36.1@3096.92,5980.84 ccw(c3069.99,5962.33) 3069.99,5995 ccw(c3069.99,6027.67) U36.1@3096.92,6009.16 ; U36.1@3100.21,5983.1 ccw(c3077.6,5967.55) 3077.6,5995 ccw(c3077.6,6022.44) U36.1@3100.21,6006.9 ; U36.1@3122.52,5995 3054.78,5995 ; 2976.49,5988.74 D9.2@2995,5988.74 3048.52,5988.74 3054.78,5995
NetJ11_1: J11.1 T1.8 | length 1076
  Bottom Layer w12: 4597.03,524.75 cw(c4499.86,427.58) J11.1@4637.25,424.74 ; 4611.82,509.96 ccw(c4682.23,580.37) J11.1@4682.23,480.79 ; 4616.93,504.85 cw(c4538.85,426.78) J11.1@4649.25,424.49 ; 4632.31,489.47 ccw(c4682.23,539.4) J11.1@4682.23,468.79 ; 4636.83,484.95 cw(c4577.84,425.97) J11.1@4661.24,424.24 ; T1.8@4654.56,897.45 cw(c4622.13,865.01) 4668,865.01 cw(c4713.87,865.01) T1.8@4681.44,897.45 ; T1.8@4668,945.92 4668,848 4585,765 4585,536.78 J11.1@4697.98,423.8
NetJ11_2: J11.2 J11.3 J11.4 T1.5 | length 2056.1
  MidLayer2 w12: J11.3@4480.43,668.42 ccw(c4464.13,697.19) 4497.19,697.19 ; J11.3@4497.19,608.84 4497.19,697.19 ; J11.3@4513.95,668.42 cw(c4530.26,697.19) 4497.19,697.19 ; J11.4@4641.93,659.09 ccw(c4544.64,561.8) 4544.64,699.39 ccw(c4544.64,836.98) J11.4@4641.93,739.69 ; J11.4@4650.42,667.58 ccw(c4573.61,590.77) 4573.61,699.39 ccw(c4573.61,808.01) J11.4@4650.42,731.21 ; J11.4@4658.9,676.06 ccw(c4602.58,619.74) 4602.58,699.39 ccw(c4602.58,779.04) J11.4@4658.9,722.72 ; J11.4@4697.98,699.39 4499.39,699.39 4497.19,697.19
  Bottom Layer w12: J11.4@4697.98,699.39 4884.39,699.39 ; J11.4@4737.06,676.06 cw(c4793.38,619.74) 4793.38,699.39 cw(c4793.38,779.04) J11.4@4737.06,722.72 ; J11.4@4745.54,667.58 cw(c4822.35,590.77) 4822.35,699.39 cw(c4822.35,808.01) J11.4@4745.54,731.21 ; J11.4@4754.03,659.09 cw(c4851.32,561.8) 4851.32,699.39 cw(c4851.32,836.98) J11.4@4754.03,739.69 ; J11.2@4888.67,671.31 ccw(c4884.41,685.02) 4898.77,685.02 ; J11.2@4898.77,608.84 4898.77,685.02 ; J11.2@4908.86,671.31 cw(c4913.12,685.02) 4898.77,685.02 ; T1.5@4954.56,897.45 cw(c4922.13,865.01) 4968,865.01 cw(c5013.87,865.01) T1.5@4981.44,897.45 ; T1.5@4968,945.92 4968,783 4884.39,699.39 ; 4884.39,699.39 4898.77,685.02
NetJ26_2: J26.2 R212.2 | length 545.6
  Bottom Layer w4: J26.2@1410.24,5665.16 cw(c1363.25,5618.16) 1429.71,5618.16 cw(c1496.16,5618.17) J26.2@1449.17,5665.16 ; J26.2@1413.07,5667.99 cw(c1372.91,5627.82) 1429.71,5627.82 cw(c1486.51,5627.82) J26.2@1446.35,5667.99 ; J26.2@1415.9,5670.81 cw(c1382.56,5637.48) 1429.71,5637.48 cw(c1476.85,5637.48) J26.2@1443.52,5670.81 ; J26.2@1418.73,5673.64 cw(c1392.22,5647.13) 1429.71,5647.13 cw(c1467.19,5647.14) J26.2@1440.69,5673.64 ; R212.2@1423.41,5527.77 ccw(c1407.5,5543.68) 1430,5543.68 ccw(c1452.5,5543.68) R212.2@1436.59,5527.77 ; R212.2@1426.24,5524.94 ccw(c1417.16,5534.02) 1430,5534.02 ccw(c1442.84,5534.02) R212.2@1433.76,5524.94 ; J26.2@1429.71,5684.62 1429.71,5600.33 1430,5600.04 R212.2@1430,5521.18
NetJ27_1: J27.1 J27.2 J27.3 J27.5 R100.1 R101.1 | length 1338.2
  Top Layer w4: J27.5@6220.54,3118.39 J27.3@6259.91,3118.39 6280,3118.39 ; J27.5@6224.69,3114.23 cw(c6234.72,3104.2) 6234.72,3118.39 cw(c6234.72,3132.57) J27.5@6224.69,3122.54 ; J27.3@6255.75,3114.23 ccw(c6245.73,3104.2) 6245.73,3118.39 ccw(c6245.73,3132.57) J27.3@6255.75,3122.54 ; J27.3@6264.06,3114.23 cw(c6274.09,3104.2) 6274.09,3118.39 cw(c6274.09,3132.57) J27.3@6264.06,3122.54 ; J27.2@6275.44,3067.89 ccw(c6265.41,3077.92) 6279.59,3077.92 ccw(c6293.77,3077.92) J27.2@6283.75,3067.89 ; J27.2@6278.56,3040.58 cw(c6297,3022.14) v1@6302.39,3047.66 ; J27.2@6283.78,3045.8 cw(c6298.82,3030.76) v1@6303.21,3051.57 ; 6289,3051.02 cw(c6300.64,3039.37) v1@6304.04,3055.49 ; J27.1@6295.12,3114.23 ccw(c6285.1,3104.2) 6285.1,3118.39 ccw(c6285.1,3132.57) J27.1@6295.12,3122.54 ; J27.1@6299.28,3118.39 6280,3118.39 ; v1(6303.52,3053.04) 6291.02,3053.04 J27.2@6279.59,3041.61 6279.59,3117.98 6280,3118.39 ; v1(6698.52,2866.71) 6723.52,2866.71 6765.23,2825 6788.33,2825 6788.57,2824.75 R100.1@6788.82,2824.51 ; v1@6702.41,2862.82 cw(c6711.8,2853.43) 6711.8,2866.71 cw(c6711.8,2879.99) v1@6702.41,2870.6 ; v1@6705.24,2859.99 cw(c6721.46,2843.77) 6721.46,2866.71 cw(c6721.46,2889.64) v1@6705.24,2873.43 ; R101.1@6782.23,2762.08 ccw(c6766.32,2777.99) 6788.82,2777.99 ccw(c6811.32,2777.99) R101.1@6795.41,2762.08 ; R100.1@6782.23,2817.92 cw(c6766.32,2802.01) 6788.82,2802.01 cw(c6811.32,2802.01) R100.1@6795.41,2817.92 ; R100.1@6782.23,2818.41 ccw(c6766.32,2802.5) 6766.32,2825 ccw(c6766.32,2847.5) R100.1@6782.23,2831.59 ; R101.1@6785.06,2759.25 ccw(c6775.98,2768.33) 6788.82,2768.33 ccw(c6801.66,2768.33) R101.1@6792.58,2759.25 ; R100.1@6785.06,2820.75 cw(c6775.98,2811.67) 6788.82,2811.67 cw(c6801.66,2811.67) R100.1@6792.58,2820.75 ; R100.1@6785.06,2821.24 ccw(c6775.98,2812.16) 6775.98,2825 ccw(c6775.98,2837.84) R100.1@6785.06,2828.76 ; R101.1@6788.82,2755 R100.1@6788.82,2824.51 ; R100.1@6788.82,2825 R100.1@6788.82,2824.51
  MidLayer2 w4: v1@6303.52,3043.54 cw(c6303.52,3020.61) 6319.74,3036.82 cw(c6335.96,3053.04) v1@6313.02,3053.04 ; v1@6303.52,3047.54 cw(c6303.52,3034.26) 6312.91,3043.65 cw(c6322.3,3053.04) v1@6309.02,3053.04 ; v1(6303.52,3053.04) 6381.86,2974.71 6435.63,2974.71 6462.44,2947.9 6471.96,2938.37 6624.19,2938.37 v1@6695.86,2866.71 ; 6677.75,2884.81 ccw(c6698.52,2905.58) v1@6698.52,2876.21 ; 6684.19,2878.37 cw(c6672.53,2866.71) v1@6689.02,2866.71 ; 6684.58,2877.98 ccw(c6698.52,2891.92) v1@6698.52,2872.21
NetJ27_4: J27.4 NT34.1 | length 79.2
  Top Layer w4: J27.4@6236.07,3015.33 cw(c6226.04,3005.31) 6240.22,3005.31 cw(c6254.4,3005.31) J27.4@6244.38,3015.33 ; NT34.1@6237.17,3007.33 ccw(c6229.81,3014.69) J27.4@6240.22,3014.69 ; NT34.1@6240,3000 6240.22,3000.22 J27.4@6240.22,3041.61 ; J27.4@6240.22,3013.62 ccw(c6249.12,3013.62) NT34.1@6242.83,3007.33
NetJ27_7: J27.7 NT39.1 | length 79.5
  Top Layer w4: J27.7@6177.01,3144.67 ccw(c6166.98,3154.69) 6181.17,3154.69 ccw(c6195.35,3154.69) J27.7@6185.32,3144.67 ; NT39.1@6177.17,3152.67 cw(c6167.52,3143.02) J27.7@6181.17,3143.02 ; NT39.1@6180,3160 6181.17,3158.83 J27.7@6181.17,3118.39 ; 6181.17,3148.66 cw(c6186.84,3148.66) NT39.1@6182.83,3152.67
NetJ27_14: J27.14 NT38.1 | length 76.5
  Top Layer w4: J27.14@6039.22,3015.33 cw(c6029.19,3005.31) 6043.37,3005.31 cw(c6057.55,3005.31) J27.14@6047.53,3015.33 ; J27.14@6043.37,3017.59 ccw(c6058.59,3017.59) NT38.1@6047.83,3006.83 ; J27.14@6043.37,3041.61 6043.37,3001.63 NT38.1@6045,3000
NetJ27_24: J27.24 NT37.1 | length 79.7
  Top Layer w4: NT37.1@5842.17,3007.33 ccw(c5831.67,3017.83) J27.24@5846.52,3017.83 ; J27.24@5842.37,3015.33 cw(c5832.34,3005.31) 5846.52,3005.31 cw(c5860.7,3005.31) J27.24@5850.68,3015.33 ; NT37.1@5845,3000 5846.52,3001.52 J27.24@5846.52,3041.61 ; NT37.1@5846.52,3010.48 ccw(c5850.98,3010.48) NT37.1@5847.83,3007.33
NetJ27_26: J27.26 NT41.1 | length 78.1
  Top Layer w4: NT41.1@5802.17,3007.33 ccw(c5790.15,3019.35) J27.26@5807.15,3019.35 ; J27.26@5803,3015.33 cw(c5792.97,3005.31) 5807.15,3005.31 cw(c5821.33,3005.31) J27.26@5811.31,3015.33 ; NT41.1@5805,3000 5807.15,3002.15 J27.26@5807.15,3041.61
NetJ27_29: J27.29 NT35.1 | length 77.4
  Top Layer w4: J27.29@5743.94,3144.67 ccw(c5733.92,3154.69) 5748.1,3154.69 ccw(c5762.28,3154.69) J27.29@5752.25,3144.67 ; J27.29@5748.1,3118.39 5748.1,3158.1 NT35.1@5750,3160 ; J27.29@5748.1,3141.25 cw(c5764.25,3141.25) NT35.1@5752.83,3152.67
NetJ27_31: J27.31 NT36.1 | length 79.6
  Top Layer w4: J27.31@5704.57,3144.67 ccw(c5694.55,3154.69) 5708.73,3154.69 ccw(c5722.91,3154.69) J27.31@5712.88,3144.67 ; NT36.1@5707.17,3152.67 cw(c5703.42,3148.92) 5708.73,3148.92 ; J27.31@5708.73,3118.39 5708.73,3158.73 NT36.1@5710,3160 ; J27.31@5708.73,3142.77 cw(c5722.73,3142.77) NT36.1@5712.83,3152.67
NetJ27_33: J27.33 NT40.1 | length 79.3
  Top Layer w4: J27.33@5665.2,3144.67 ccw(c5655.18,3154.69) 5669.36,3154.69 ccw(c5683.54,3154.69) J27.33@5673.51,3144.67 ; NT40.1@5667.17,3152.67 cw(c5661.9,3147.4) J27.33@5669.36,3147.4 ; J27.33@5669.36,3118.39 5669.36,3159.36 NT40.1@5670,3160 ; J27.33@5669.36,3144.29 cw(c5681.21,3144.29) NT40.1@5672.83,3152.67
NetJ27_40: J27.40 Q11.2 R100.2 R101.2 | length 2749
  Top Layer w4: v4@5473.42,2964.43 ccw(c5468.22,2975) 5480,2975 ; v4@5475.18,2960.84 ccw(c5471.38,2968.58) 5480,2968.58 ; v4(5477.74,2955.62) 5477.74,2952.17 5479.96,2949.96 5480,2950 5480,2975 5485,2980 5528,2980 5531.56,2983.56 5531.56,3000 ; 5480,2973.86 ccw(c5495.99,2973.86) v4@5484.68,2962.56 ; J27.40@5527.41,3015.33 cw(c5517.38,3005.31) 5531.56,3005.31 cw(c5545.74,3005.31) J27.40@5535.71,3015.33 ; 5531.56,2988.04 5531.56,3000 ; J27.40@5531.56,3041.61 5531.56,3000 ; v1@6812.77,2727.08 cw(c6825.99,2730.5) 6816.33,2740.15 ; v1@6814.94,2738.76 cw(c6830.48,2723.23) R101.2@6830.97,2745.19 ; v1(6815.19,2727.71) 6815.19,2739.01 R101.2@6831.18,2755 6866.71,2755 6880,2741.71 7065,2741.71 Q11.2@7065,2744.21 ; 6815.62,2739.44 ccw(c6800.55,2754.51) R101.2@6821.86,2754.51 ; v1@6816.64,2728.08 cw(c6833.85,2732.53) R101.2@6821.28,2745.1 ; v1@6820.52,2729.08 cw(c6841.72,2734.57) R101.2@6826.23,2750.05 ; R101.2@6821.56,2745.38 cw(c6830.77,2736.17) R101.2@6831.06,2749.19 ; R101.2@6822.45,2746.27 ccw(c6814.21,2754.51) R101.2@6825.86,2754.51 ; v1@6824.39,2730.09 cw(c6849.58,2736.6) R101.2@6831.18,2755 ; R101.2@6824.59,2762.08 ccw(c6808.68,2777.99) 6831.18,2777.99 ccw(c6853.68,2777.99) R101.2@6837.77,2762.08 ; R100.2@6824.59,2817.92 cw(c6808.68,2802.01) 6831.18,2802.01 cw(c6853.68,2802.01) R100.2@6837.77,2817.92 ; R101.2@6827.42,2759.25 ccw(c6818.34,2768.33) 6831.18,2768.33 ccw(c6844.02,2768.33) R101.2@6834.94,2759.25 ; R100.2@6827.42,2820.75 cw(c6818.34,2811.67) 6831.18,2811.67 cw(c6844.02,2811.67) R100.2@6834.94,2820.75 ; R101.2@6831.18,2766.03 R100.2@6831.18,2825 ; R101.2@6834.94,2751.24 cw(c6844.02,2742.16) 6844.02,2755 cw(c6844.02,2767.84) R101.2@6834.94,2758.76 ; R101.2@6837.77,2748.41 cw(c6853.68,2732.5) 6853.68,2755 cw(c6853.68,2777.5) R101.2@6837.77,2761.59 ; 7023.39,2741.71 ccw(c7023.39,2784.84) Q11.2@7053.89,2754.34 ; 7030.73,2741.71 cw(c7030.73,2708.96) Q11.2@7053.89,2732.12 ; 7033.04,2741.71 ccw(c7033.04,2775.19) Q11.2@7056.72,2751.51 ; 7040.38,2741.71 cw(c7040.38,2718.61) Q11.2@7056.72,2734.94 ; 7042.7,2741.71 ccw(c7042.7,2765.53) Q11.2@7059.54,2748.68
  MidLayer2 w4: v4@5477.74,2945.81 cw(c5477.74,2922.13) 5494.49,2938.87 cw(c5511.24,2955.62) v4@5487.56,2955.62 ; v4@5477.74,2949.81 cw(c5477.74,2935.78) 5487.66,2945.7 cw(c5497.58,2955.62) v4@5483.56,2955.62 ; v4(5477.74,2955.62) 5500,2933.37 5500,2894.63 5520,2874.63 5561.29,2874.63 5610.54,2825.37 5676.19,2825.37 5809.86,2691.71 v1(5856.86,2691.71) ; v1@5850.14,2684.99 ccw(c5833.92,2668.77) 5833.92,2691.71 ccw(c5833.92,2714.64) v1@5850.14,2698.43 ; v1@5852.97,2687.82 ccw(c5843.58,2678.43) 5843.58,2691.71 ccw(c5843.58,2704.99) v1@5852.97,2695.6
  Bottom Layer w4: v1@5856.86,2682.21 cw(c5856.86,2659.27) 5873.07,2675.49 cw(c5889.29,2691.71) v1@5866.36,2691.71 ; v1@5856.86,2686.21 cw(c5856.86,2672.93) 5866.25,2682.32 cw(c5875.64,2691.71) v1@5862.36,2691.71 ; v1(5856.86,2691.71) 5898.52,2650.04 6351.19,2650.04 6440.19,2739.04 6696.84,2739.04 6719.33,2739.04 6750,2708.37 6795.86,2708.37 v1(6815.19,2727.71) ; v1@6805.69,2727.71 cw(c6782.76,2727.71) 6798.97,2711.49 cw(c6815.19,2695.27) v1@6815.19,2718.21 ; v1@6809.69,2727.71 cw(c6796.41,2727.71) 6805.8,2718.32 cw(c6815.19,2708.93) v1@6815.19,2722.21
NetJ28_7: J28.7 NT28.1 | length 87
  Top Layer w4: NT28.1@4205,4020 NT28.1@4212.08,4020 ; NT28.1@4216.58,4016.49 cw(c4225.06,4008.01) J28.7@4225.06,4020 ; NT28.1@4216.98,4020 cw(c4216.98,4014.21) J28.7@4222.65,4015.37 ; NT28.1@4218.73,4014.57 ccw(c4212.08,4013.21) NT28.1@4212.08,4020 ; NT28.1@4219.41,4013.66 cw(c4234.71,3998.35) J28.7@4234.71,4020 ; J28.7@4246.61,4015.75 4242.36,4020 NT28.1@4212.08,4020
NetJ28_14: J28.14 NT29.1 | length 88.9
  Top Layer w4: J28.14@4323.39,3877.95 4325.43,3880 NT29.1@4365,3880 ; J28.14@4346.84,3876.63 cw(c4354.98,3868.49) NT29.1@4354.98,3880 ; J28.14@4349.67,3873.8 cw(c4364.63,3858.83) NT29.1@4364.63,3880 ; J28.14@4349.67,3882.11 ccw(c4354.75,3887.19) NT29.1@4354.75,3880 ; NT29.1@4357.67,3877.17 ccw(c4350.84,3870.34) 4350.84,3880 ccw(c4350.84,3889.66) NT29.1@4357.67,3882.83
NetJ28_24: J28.24 NT33.1 | length 87.2
  Top Layer w4: J28.24@4323.39,3681.1 4327.28,3685 NT33.1@4365,3685 ccw(c4365,3666.56) J28.24@4350.22,3677.59 ; J28.24@4347.01,3679.98 cw(c4357.02,3672.51) NT33.1@4357.02,3685 ; NT33.1@4357.67,3682.17 ccw(c4350.84,3675.34) 4350.84,3685 ccw(c4350.84,3694.66) NT33.1@4357.67,3687.83
NetJ28_26: J28.26 NT30.1 | length 86.1
  Top Layer w4: J28.26@4323.39,3641.73 4326.65,3645 NT30.1@4365,3645 ccw(c4365,3625.53) J28.26@4350.03,3637.98 ; J28.26@4346.95,3640.53 cw(c4356.47,3632.62) NT30.1@4356.47,3645 ; NT30.1@4357.67,3642.17 ccw(c4350.84,3635.34) 4350.84,3645 ccw(c4350.84,3654.66) NT30.1@4357.67,3647.83
NetJ28_29: J28.29 NT26.1 | length 89.3
  Top Layer w4: NT26.1@4212.33,3582.17 cw(c4219.16,3575.34) 4219.16,3585 cw(c4219.16,3594.66) NT26.1@4212.33,3587.83 ; NT26.1@4214.51,3585 cw(c4214.51,3572.92) J28.29@4223.15,3581.37 ; 4215.91,3585 ccw(c4215.91,3591.25) J28.29@4220.33,3586.83 ; J28.29@4220.29,3578.57 ccw(c4205,3563.61) NT26.1@4205,3585 4244.29,3585 J28.29@4246.61,3582.68
NetJ28_31: J28.31 NT27.1 | length 86.1
  Top Layer w4: NT27.1@4212.33,3537.17 cw(c4219.16,3530.34) 4219.16,3540 cw(c4219.16,3549.66) NT27.1@4212.33,3542.83 ; NT27.1@4213.49,3540 ccw(c4213.49,3552.39) J28.31@4223.04,3544.5 ; J28.31@4219.96,3547.05 cw(c4205,3559.4) NT27.1@4205,3540 4243.31,3540 J28.31@4246.61,3543.31
NetJ28_33: J28.33 NT31.1 | length 79.5
  Top Layer w4: NT31.1@4205,3505 4245.55,3505 J28.33@4246.61,3503.94 ; NT31.1@4207.74,3505 cw(c4207.74,3487.19) J28.33@4220.33,3499.78 ; NT31.1@4212.33,3502.17 cw(c4219.16,3495.34) 4219.16,3505 cw(c4219.16,3514.66) NT31.1@4212.33,3507.83 ; NT31.1@4212.87,3505 ccw(c4212.87,3515.55) J28.33@4220.33,3508.09
NetJ29_CD: J29.CD R253.2 U66.2 | length 2698.9
  MidLayer2 w4: v1(5173.52,1591.71) 5375.9,1591.71 5500.56,1467.04 5756.65,1467.04 5790.52,1433.16 5790.52,1300.52 5770,1280 5770,1253.56 5783.35,1240.21 5884.75,1240.21 5952.91,1308.37 6216.63,1308.37 v4(6260,1265) ; v1@5177.41,1587.82 cw(c5186.8,1578.43) 5186.8,1591.71 cw(c5186.8,1604.99) v1@5177.41,1595.6 ; v1@5180.24,1584.99 cw(c5196.46,1568.77) 5196.46,1591.71 cw(c5196.46,1614.64) v1@5180.24,1598.43 ; v4@6250.19,1265 ccw(c6226.5,1265) 6243.25,1281.75 ccw(c6260,1298.5) v4@6260,1274.81 ; v4@6254.19,1265 ccw(c6240.16,1265) 6250.08,1274.92 ccw(c6260,1284.84) v4@6260,1270.81 ; v4(6485,1265) 6485.87,1265.87 6631.77,1265.87 6640.94,1275.04 v1(6699.52,1275.04) ; v4@6489.11,1260.89 cw(c6501.14,1248.86) 6501.14,1265.87 ; v4@6489.11,1269.11 ccw(c6496.92,1276.92) 6496.92,1265.87 ; v4@6491.94,1258.06 cw(c6510.8,1239.2) 6510.8,1265.87 ; v4@6491.94,1271.94 ccw(c6506.57,1286.57) 6506.57,1265.87 ; v1@6692.81,1268.32 ccw(c6676.59,1252.11) 6676.59,1275.04 ccw(c6676.59,1297.98) v1@6692.81,1281.76 ; v1@6695.64,1271.15 ccw(c6686.25,1261.76) 6686.25,1275.04 ccw(c6686.25,1288.32) v1@6695.64,1278.93
  Bottom Layer w4: v1(5173.52,1591.71) 5271.71,1591.71 5280,1600 U66.2@5280,1634.88 ; v4(6260,1265) v4(6485,1265) ; v4@6264.11,1260.89 cw(c6274.03,1250.97) 6274.03,1265 cw(c6274.03,1279.03) v4@6264.11,1269.11 ; v4@6266.94,1258.06 cw(c6283.69,1241.31) 6283.69,1265 cw(c6283.69,1288.69) v4@6266.94,1271.94 ; v4@6478.06,1258.06 ccw(c6461.31,1241.31) 6461.31,1265 ccw(c6461.31,1288.69) v4@6478.06,1271.94 ; v4@6480.89,1260.89 ccw(c6470.97,1250.97) 6470.97,1265 ccw(c6470.97,1279.03) v4@6480.89,1269.11 ; J29.CD@6627.71,1358.42 cw(c6624.95,1349.77) 6634.03,1349.77 ; J29.CD@6628.92,1362.23 cw(c6626.7,1355.25) 6634.03,1355.25 cw(c6641.37,1355.25) J29.CD@6639.14,1362.23 ; J29.CD@6634.03,1404.65 6634.03,1349.77 ; R253.2@6639.44,1248.72 ccw(c6635.57,1256) 6643.82,1256 ; J29.CD@6640.35,1358.42 ccw(c6643.11,1349.77) 6634.03,1349.77 ; R253.2@6643.82,1240 6643.82,1256 ; R253.2@6648.19,1248.72 cw(c6652.07,1256) 6643.82,1256 ; v1@6692.81,1268.32 ccw(c6676.59,1252.11) 6676.59,1275.04 ccw(c6676.59,1297.98) v1@6692.81,1281.76 ; v1@6695.64,1271.15 ccw(c6686.25,1261.76) 6686.25,1275.04 ccw(c6686.25,1288.32) v1@6695.64,1278.93 ; v1(6699.52,1275.04) 6660.52,1275.04 ; 6634.03,1349.77 6636.37,1347.44 6652.52,1347.44 6660.52,1339.44 6660.52,1275.04 ; 6643.82,1256 6660.52,1272.71 6660.52,1275.04
NetJ29_WP: J29.WP R254.2 U65.2 | length 1779.7
  MidLayer2 w4: v1(5148.19,1408.37) 5262.21,1408.37 5428.88,1241.71 5561.2,1241.71 5580.78,1261.29 5690.26,1261.29 5727.33,1224.21 5891.38,1224.21 5916.37,1249.21 6056.02,1249.21 v1(6056.86,1250.04) ; v1@5152.08,1404.49 cw(c5161.47,1395.1) 5161.47,1408.37 cw(c5161.47,1421.65) v1@5152.08,1412.26 ; v1@5154.91,1401.66 cw(c5171.13,1385.44) 5171.13,1408.37 cw(c5171.13,1431.31) v1@5154.91,1415.09
  Bottom Layer w4: v1(5148.19,1408.37) 5148.19,1498.19 5155,1505 5205,1505 5215,1495 5215,1425 5220,1420 5270,1420 5280,1410 U65.2@5280,1364.88 ; J29.WP@6000.49,1360.17 cw(c5990.39,1342.43) 6010.8,1342.43 ; J29.WP@6002.47,1363.65 cw(c5994.31,1349.31) 6010.8,1349.31 cw(c6027.3,1349.31) J29.WP@6019.14,1363.65 ; J29.WP@6010.8,1404.65 6010.8,1342.43 ; J29.WP@6021.12,1360.17 ccw(c6031.22,1342.43) 6010.8,1342.43 ; v1@6050.14,1256.76 ccw(c6033.92,1272.98) 6056.86,1272.98 ccw(c6079.79,1272.98) v1@6063.57,1256.76 ; v1@6052.97,1253.93 ccw(c6043.58,1263.32) 6056.86,1263.32 ccw(c6070.14,1263.32) v1@6060.75,1253.93 ; R254.2@6075.94,1235.02 ccw(c6066.9,1229.3) 6066.9,1240 ; R254.2@6075.94,1244.98 cw(c6066.9,1250.7) 6066.9,1240 ; R254.2@6083.82,1240 6066.9,1240 ; 6010.8,1342.43 6056.86,1296.37 v1(6056.86,1250.04) 6066.9,1240
NetJ30_CD: J30.CD R255.2 U68.2 | length 1646.7
  Bottom Layer w4: U68.2@5515,1634.88 5515,1540 5538.29,1516.71 5806.86,1516.71 6015.19,1308.37 6015.19,1214.34 6021.82,1207.71 6373.89,1207.71 R255.2@6406.18,1240 ; 6389.43,1223.25 cw(c6406.18,1206.5) R255.2@6406.18,1230.19 ; 6390.62,1224.44 ccw(c6375.55,1239.51) R255.2@6396.86,1239.51 ; R255.2@6396.26,1230.08 cw(c6406.18,1220.16) R255.2@6406.18,1234.19 ; R255.2@6397.45,1231.27 ccw(c6389.21,1239.51) R255.2@6400.86,1239.51 ; R255.2@6409.83,1236.35 6413.48,1240 6435,1240 6436.82,1240 6445,1240 6453.82,1231.18 J30.CD@6453.82,1128.35 ; R255.2@6409.94,1236.24 cw(c6419.02,1227.16) 6419.02,1240 cw(c6419.02,1252.84) R255.2@6409.94,1243.76 ; R255.2@6412.77,1233.41 cw(c6428.68,1217.5) 6428.68,1240 cw(c6428.68,1262.5) R255.2@6412.77,1246.59 ; J30.CD@6439.08,1169.46 ccw(c6403.52,1205.02) 6453.82,1205.02 ccw(c6504.12,1205.02) J30.CD@6468.55,1169.46 ; J30.CD@6441.91,1166.63 ccw(c6413.17,1195.37) 6453.82,1195.37 ccw(c6494.46,1195.37) J30.CD@6465.72,1166.63 ; J30.CD@6444.74,1163.8 ccw(c6422.83,1185.71) 6453.82,1185.71 ccw(c6484.8,1185.71) J30.CD@6462.89,1163.8
NetJ30_WP: J30.WP R256.2 U67.2 | length 2732.7
  Bottom Layer w4: U67.2@5509.66,1342.87 cw(c5503.28,1333.04) 5515,1333.04 cw(c5526.72,1333.04) U67.2@5520.34,1342.87 ; U67.2@5515,1364.88 5515,1266.9 5637.2,1144.69 5735.09,1144.69 5757.94,1167.54 5772.44,1167.54 5790.19,1149.79 5790.19,1141.71 5860.9,1071 5989.51,1071 6085.8,974.71 6460.54,974.71 6544.21,1058.37 6608.37,1058.37 6620,1070 6620,1182.85 6628.86,1191.71 6682,1191.71 ; 6682,1192 6706,1192 6714,1184 6714,1051.23 6731.86,1033.37 7043.37,1033.37 7077.05,1067.05 ; R256.2@6966.18,1240 7055,1240 7077.05,1217.95 J30.WP@7077.05,1128.35 7077.05,1067.05 ; R256.2@6969.94,1236.24 cw(c6979.02,1227.16) 6979.02,1240 cw(c6979.02,1252.84) R256.2@6969.94,1243.76 ; R256.2@6972.77,1233.41 cw(c6988.68,1217.5) 6988.68,1240 cw(c6988.68,1262.5) R256.2@6972.77,1246.59 ; J30.WP@7062.31,1169.46 ccw(c7026.75,1205.02) 7077.05,1205.02 ccw(c7127.34,1205.02) J30.WP@7091.78,1169.46 ; J30.WP@7065.14,1166.63 ccw(c7036.4,1195.37) 7077.05,1195.37 ccw(c7117.69,1195.37) J30.WP@7088.95,1166.63 ; J30.WP@7067.15,1083.63 cw(c7058.2,1067.05) 7077.05,1067.05 ; J30.WP@7067.97,1163.8 ccw(c7046.06,1185.71) 7077.05,1185.71 ccw(c7108.03,1185.71) J30.WP@7086.12,1163.8 ; J30.WP@7069.05,1087.15 cw(c7061.81,1073.75) 7077.05,1073.75 cw(c7092.28,1073.75) J30.WP@7085.04,1087.15 ; J30.WP@7086.94,1083.63 ccw(c7095.9,1067.05) 7077.05,1067.05
NetLED4_1: LED4.1 R62.2 | length 321.3
  Top Layer w4: v1@2876.93,5968.2 cw(c2861.96,5952.68) 2883.52,5952.68 ; v1@2879.71,5971.08 cw(c2871.04,5962.1) 2883.52,5962.1 cw(c2896.01,5962.1) v1@2887.34,5971.08 ; v1(2883.52,5975.04) 2883.52,5952.68 ; LED4.1@2888.95,5933.9 ccw(c2869.21,5938.37) 2883.52,5952.68 ; v1@2890.12,5968.2 ccw(c2905.08,5952.68) 2883.52,5952.68 ; LED4.1@2892.86,5933.02 ccw(c2877.58,5936.48) 2888.65,5947.55 ccw(c2899.73,5958.63) LED4.1@2903.18,5943.35 ; LED4.1@2902.3,5947.25 cw(c2897.84,5966.99) 2883.52,5952.68 ; LED4.1@2906.2,5930 2883.52,5952.68
  Bottom Layer w4: R62.2@2856.18,5975 2883.48,5975 v1(2883.52,5975.04) ; R62.2@2859.94,5971.24 cw(c2869.02,5962.16) 2869.02,5975 cw(c2869.02,5987.84) R62.2@2859.94,5978.76 ; R62.2@2860.49,5975 ccw(c2860.49,5998.07) v1@2876.81,5981.76 ; R62.2@2860.69,5975 cw(c2860.69,5952.2) v1@2876.81,5968.32 ; R62.2@2862.77,5968.41 cw(c2878.68,5952.5) 2878.68,5975 cw(c2878.68,5997.5) R62.2@2862.77,5981.59 ; 2870.15,5975 ccw(c2870.15,5988.42) v1@2879.64,5978.93 ; 2870.34,5975 cw(c2870.34,5961.86) v1@2879.64,5971.15
NetLED5_1: LED5.1 R63.2 | length 1239.6
  Top Layer w4: v1(2883.52,5100.04) 3062.23,5100.04 3082.19,5120 3082.19,5617.81 3066.74,5633.26 LED5.1@2909.01,5633.26 ; v1@2887.41,5096.15 cw(c2896.8,5086.76) 2896.8,5100.04 cw(c2896.8,5113.32) v1@2887.41,5103.93 ; v1@2890.24,5093.32 cw(c2906.46,5077.11) 2906.46,5100.04 cw(c2906.46,5122.98) v1@2890.24,5106.76 ; LED5.1@2915.86,5626.41 cw(c2932.39,5609.88) 2932.39,5633.26 cw(c2932.39,5656.64) LED5.1@2915.86,5640.11 ; LED5.1@2918.69,5623.59 cw(c2942.05,5600.22) 2942.05,5633.26 cw(c2942.05,5666.3) LED5.1@2918.69,5642.94 ; LED5.1@2921.52,5620.76 cw(c2951.71,5590.57) 2951.71,5633.26 cw(c2951.71,5675.96) LED5.1@2921.52,5645.77
  Bottom Layer w4: R63.2@2859.97,5091.26 cw(c2868.91,5082.43) 2868.91,5095 cw(c2868.91,5107.57) R63.2@2859.97,5098.74 ; R63.2@2862.81,5088.45 cw(c2878.48,5072.98) v1@2878.48,5095 ; R63.2@2862.81,5101.55 ccw(c2878.48,5117.02) v1@2878.48,5095 ; R63.2@2863.7,5095 ccw(c2863.7,5113.4) v1@2878.96,5103.12 ; 2871.22,5095 ccw(c2871.22,5108.33) v1@2882.28,5100.88 ; 2872.76,5095 cw(c2872.76,5089.28) v1@2876.81,5093.32 ; v1@2875.65,5105.35 cw(c2856.18,5118.48) R63.2@2856.18,5095 v1@2878.48,5095 ; v1(2883.52,5100.04) v1@2878.48,5095
NetLED7_1: LED7.1 R67.2 | length 343.6
  Top Layer w4: v1@2885.81,5266.76 ccw(c2869.59,5282.98) 2892.52,5282.98 ccw(c2915.46,5282.98) v1@2899.24,5266.76 ; v1@2888.64,5263.93 ccw(c2879.25,5273.32) 2892.52,5273.32 ccw(c2905.8,5273.32) v1@2896.41,5263.93 ; v1(2892.52,5260.04) 2892.52,5288.29 2909.07,5304.83 ; LED7.1@2901.03,5317.96 cw(c2894.33,5304.83) 2909.07,5304.83 ; LED7.1@2902.85,5321.52 cw(c2897.66,5311.36) 2909.07,5311.36 cw(c2920.47,5311.36) LED7.1@2915.29,5321.52 ; LED7.1@2909.07,5333.71 2909.07,5304.83 ; LED7.1@2917.11,5317.96 ccw(c2923.81,5304.83) 2909.07,5304.83
  Bottom Layer w4: R67.2@2856.18,5260 2892.48,5260 v1(2892.52,5260.04) ; R67.2@2859.94,5256.24 cw(c2869.02,5247.16) 2869.02,5260 cw(c2869.02,5272.84) R67.2@2859.94,5263.76 ; R67.2@2862.77,5253.41 cw(c2878.68,5237.5) 2878.68,5260 cw(c2878.68,5282.5) R67.2@2862.77,5266.59 ; 2869.49,5260 ccw(c2869.49,5283.07) v1@2885.81,5266.76 ; 2869.69,5260 cw(c2869.69,5237.2) v1@2885.81,5253.32 ; 2879.15,5260 ccw(c2879.15,5273.42) v1@2888.64,5263.93 ; 2879.34,5260 cw(c2879.34,5246.86) v1@2888.64,5256.15
NetLED8_2: LED8.2 R91.2 | length 1174.5
  Top Layer w4: R91.2@4266.18,5391.67 4390.19,5391.67 4415.15,5366.71 4602.57,5366.71 4615.52,5379.67 4615.52,5482.43 4595.96,5502 4438.48,5502 4354.02,5586.46 4354.02,5600.96 4377.97,5624.9 LED8.2@4520.49,5624.9 ; R91.2@4269.94,5387.91 cw(c4279.02,5378.83) 4279.02,5391.67 cw(c4279.02,5404.51) R91.2@4269.94,5395.43 ; R91.2@4272.77,5385.08 cw(c4288.68,5369.17) 4288.68,5391.67 cw(c4288.68,5414.16) R91.2@4272.77,5398.26 ; LED8.2@4507.98,5612.4 ccw(c4477.79,5582.21) 4477.79,5624.9 ccw(c4477.79,5667.6) LED8.2@4507.98,5637.41 ; LED8.2@4510.81,5615.23 ccw(c4487.45,5591.87) 4487.45,5624.9 ccw(c4487.45,5657.94) LED8.2@4510.81,5634.58 ; LED8.2@4513.64,5618.06 ccw(c4497.1,5601.52) 4497.1,5624.9 ccw(c4497.1,5648.29) LED8.2@4513.64,5631.75